# Altium PCB RF-IR-Blaster-v1.1.PcbDoc (part 1 of 3)
Units mil, origin at the board's own origin, x right, y up, seen from the top; angles counter-clockwise.
Board outline 2559.06 x 2401.57 mil, 2 copper layers (Top Layer, Bottom Layer), stack 62.205 mil thick; 68 components, 37 nets, 870 pads, 147 vias.
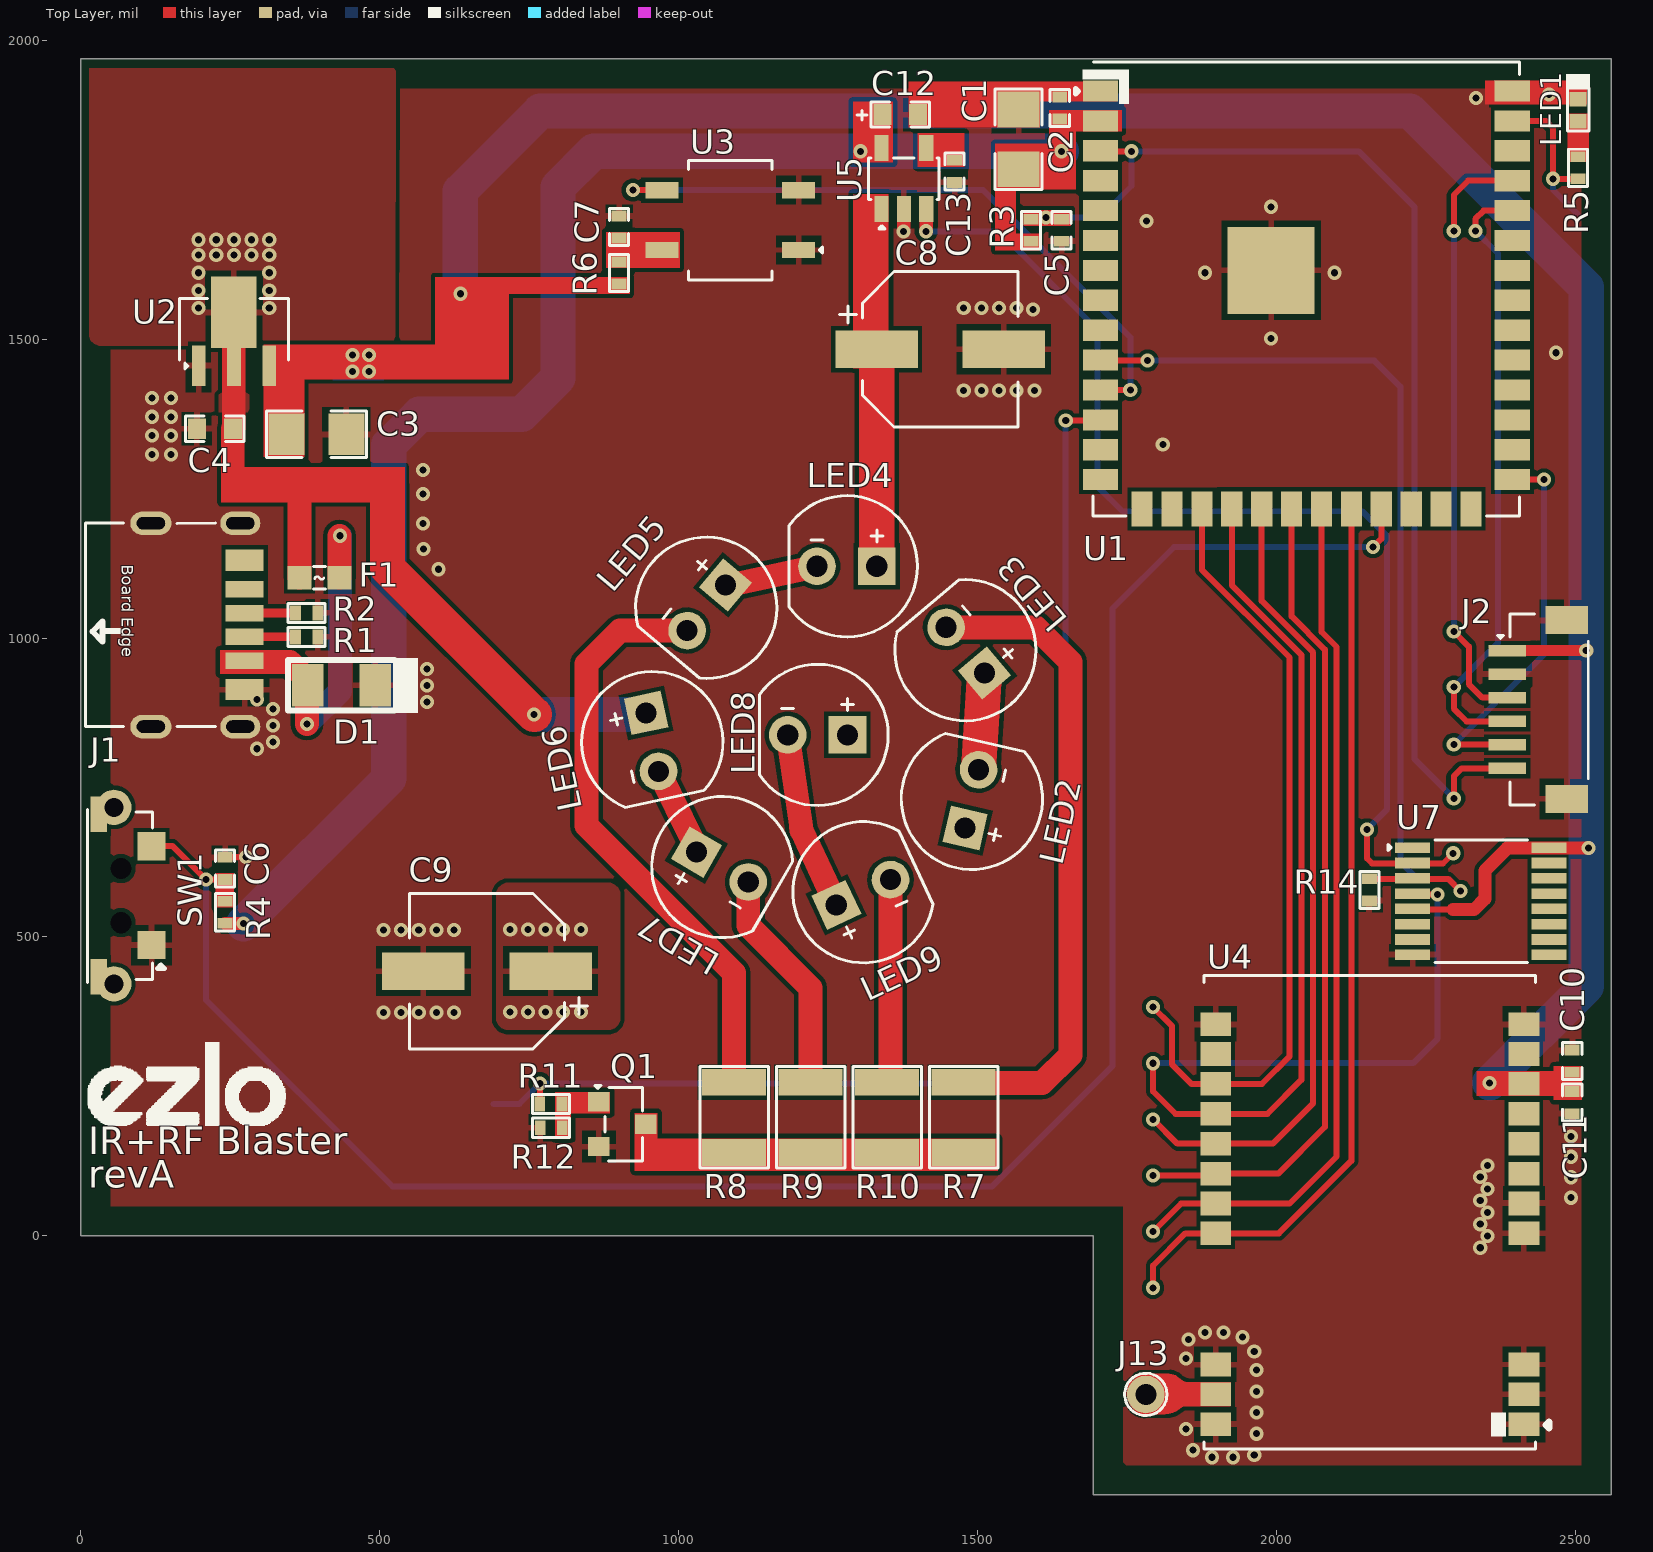
[diagram p0: Top Layer view]
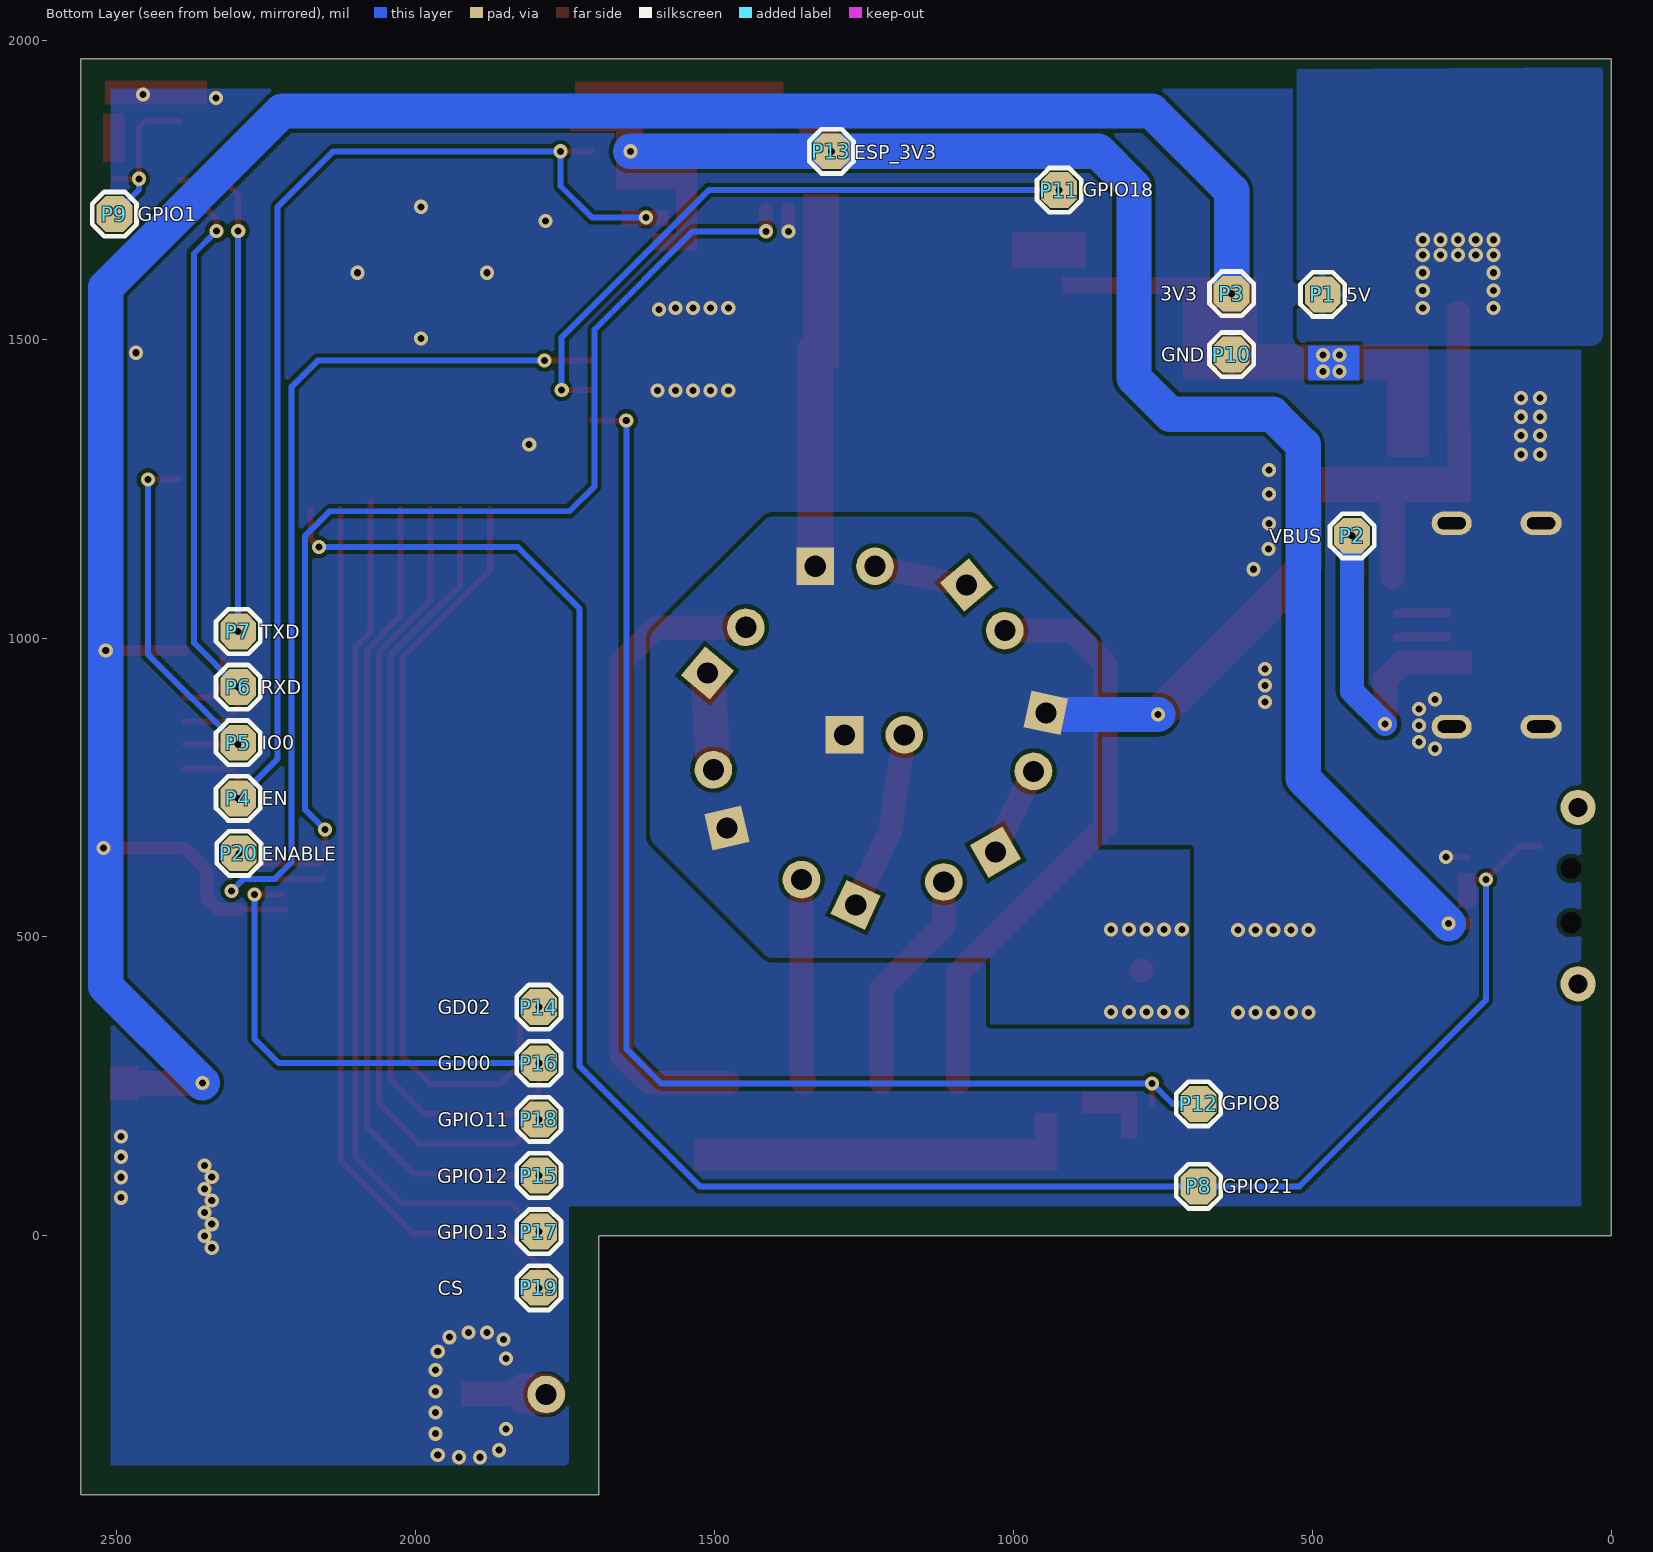
[diagram p1: Bottom Layer view, seen from below]

## Layer stack, top to bottom
Top Solder: solder mask 0.3937, Solder Resist, Dk 3.3
Top Layer: signal copper 1.378
Dielectric 1: dielectric 59.4488, FR-4, Dk 4.5
Bottom Layer: signal copper 1.378
Bottom Solder: solder mask 0.3937, Solder Resist, Dk 3.3

## Board outline
0,0 0,1968.5 2559.06,1968.5 2559.06,-433.07 1692.91,-433.07 1692.91,0

## Design rules (kind name [scope] priority, off if disabled: settings)
Clearance [All] p1: gap=7 ignorepadtopadclearanceinfootprint=FALSE except(0: Arc-Hole Track-Hole SMDPad-Hole THPad-Hole Via-Hole Fill-Hole Poly-Hole Region-Hole Text-Hole; 4: Arc-SMDPad Track-SMDPad SMDPad-SMDPad)
HoleSize [All] p1: absolutevalues=TRUE maxlimit=1000 minlimit=1 maxpercent=80.000 minpercent=20.000
HoleToHoleClearance [All] p1: gap=0 allowstackedmicrovias=TRUE
MinimumSolderMaskSliver [All] p1: minsoldermaskwidth=0
PolygonConnect [All] p1: thpad.connectstyle=Direct thpad.reliefconductorwidth=10 thpad.reliefentries=4 thpad.polygonreliefangle="90 Angle" thpad.airgapwidth=10 smdpad.connectstyle=Relief smdpad.reliefconductorwidth=10 smdpad.reliefentries=4 smdpad.polygonreliefangle="90 Angle" smdpad.airgapwidth=10 via.connectstyle=Direct via.reliefconductorwidth=10 via.reliefentries=4 via.polygonreliefangle="90 Angle" via.airgapwidth=10
RoutingVias [All] p1: holewidth=11.81 width=23.62 viastyle="Through Hole" minholewidth=11.81 minwidth=23.62 maxholewidth=11.81 maxwidth=23.62
SilkToSilkClearance [All] p1: silktosilkclearance=0
SilkToSolderMaskClearance [IsPad] p1: minsilkscreentomaskgap=0 clearancetoexposedcopper=TRUE
SolderMaskExpansion [All] p1: expansion=4 istentingtop=FALSE
Width [All] p1: maxlimit=59.06 minlimit=10 preferedwidth=22
25 further rules are at their usual default settings.

## Classes and differential pairs
component class U_USB-Power-Sheet: C3 C4 C12 C13 D1 F1 J1 P1 P2 P3 P10 P13 R1 R2 U2 U5
component class U_IR-Transmitter-Sheet: C8 C9 LED2 LED3 LED4 LED5 LED6 LED7 LED8 LED9 P12 Q1 R7 R8 R9 R10 R11 R12
component class U_IR-Reciever-Sheet: C7 P11 R6 U3
component class U_Controller-Sheet: C1 C2 C5 C6 J2 LED1 P4 P5 P6 P7 P8 P9 R3 R4 R5 SW1 U1
component class U_CC1101-Sheet: C10 C11 J13 P14 P15 P16 P17 P18 P19 P20 R14 U4 U7

## Components (designator, comment, footprint, x,y, rotation, side; value= is the part's Value field where it differs from the comment)
C1 "22uF" Cap-1206 1568,1834 r270 top locked
C2 "100nF" Cap-0402 1637,1886.5 r270 top
C3 "22uF" Cap-1206 394.01,1340.86 r180 top locked
C4 "10uF" CAP-0603 224,1350 r0 top locked
C5 "1uF" Cap-0402 1640.01,1681.93 r90 top locked
C6 "100nF" Cap-0402 241.01,614.86 r270 top locked
C7 "4.7uF" Cap-0402 900.01,1687.43 r270 top locked
C8 "220uF" RT1A221M0605 1437.01,1482.93 r0 top locked
C9 "220uF" RT1A221M0605 679.13,442.91 r180 top locked
C10 "1uF" Cap-0402 2494.01,292.43 r270 top locked
C11 "100nF" Cap-0402 2494.01,222.93 r90 top locked
C12 "1uF" F981E105MMA 1370.29,1875.35 r0 top
C13 "10nF" Cap-0402 1461,1780.5 r90 top
D1 "SMF5.0CA" SOD-123FL 435.71,920.93 r180 top locked
F1 "BSMD0603L-100" fuse-0603 399.01,1100.86 r180 top locked
J1 "TYPE-C-31-M-17" TYPE-C-31-M-17_ 195.35,1021.94 r270 top locked
J2 "Voltlink Target" "Voltlink Target" 2435.3,880.46 r270 top locked
J13 "Test Point TH 0.9mm" "TP 0.9mm" 1781,-265 r0 top
LED1 "XZVG68W-2" LED-0402 2504.01,1882.63 r90 top locked
LED2 "IR333-A" IR333_A 1490.01,730.93 r77 top locked
LED3 "IR333-A" IR333_A 1479.15,979.63 r130 top locked
LED4 "IR333-A" IR333_A 1281.01,1119.93 r180 top locked
LED5 "IR333-A" IR333_A 1045.87,1050.63 r230 top locked
LED6 "IR333-A" IR333_A 955.61,825.84 r282 top locked
LED7 "IR333-A" IR333_A 1072.71,616.93 r330 top locked
LED8 "IR333-A" IR333_A 1232,838 r180 top
LED9 "IR333-A" IR333_A 1308.68,574.87 r25 top locked
P1 "TEST POINT" Test-point 482.28,1574.8 r180 bottom locked
P2 "TEST POINT" Test-point 433,1171 r180 bottom locked
P3 "TEST POINT" Test-point 634.55,1575.8 r180 bottom locked
P4 "TEST POINT" Test-point 2296.01,731.93 r180 bottom locked
P5 "TEST POINT" Test-point 2296.01,824.93 r180 bottom locked
P6 "TEST POINT" Test-point 2296.01,917.93 r180 bottom locked
P7 "TEST POINT" Test-point 2296.01,1010.93 r180 bottom locked
P8 "TEST POINT" Test-point 690,83 r180 bottom
P9 "TEST POINT" Test-point 2503,1709 r270 bottom
P10 "TEST POINT" Test-point 634.55,1474 r180 bottom locked
P11 "TEST POINT" Test-point 923,1749 r180 bottom
P12 "TEST POINT" Test-point 690,221 r180 bottom
P13 "TEST POINT" Test-point 1304,1814 r180 bottom
P14 "TEST POINT" Test-point 1793,382.77 r90 bottom
P15 "TEST POINT" Test-point 1793,101.11 r90 bottom
P16 "TEST POINT" Test-point 1793,288.89 r90 bottom
P17 "TEST POINT" Test-point 1793,7.23 r90 bottom
P18 "TEST POINT" Test-point 1793,195 r90 bottom
P19 "TEST POINT" Test-point 1793,-86.66 r90 bottom
P20 "TEST POINT" Test-point 2295,640 r180 bottom
Q1 "YJL2302B" SOT-23-3L_ 905.51,187.01 r270 top locked
R1 "5.1K" Res-0402 377.5,1002 r180 top locked
R2 "5.1K" Res-0402 377.5,1042 r180 top locked
R3 "10K" Res-0402 1589.01,1681.93 r270 top locked
R4 "10K" Res-0402 241.01,541.36 r270 top locked
R5 "1K" Res-0402 2504.01,1786.43 r270 top locked
R6 "100R" Res-0402 900.01,1610.43 r270 top locked
R7 "14R" Res_1210 1476.38,198.34 r270 top
R8 "14R" Res_1210 1092.52,198.34 r270 top
R9 "14R" Res_1210 1220.47,198.34 r270 top
R10 "14R" Res_1210 1348.43,198.34 r270 top
R11 "100R" Res-0402 786,221 r180 top locked
R12 "10K" Res-0402 786.5,181 r0 top locked
R14 "10K" Res-0402 2155,578.89 r90 top
SW1 "YTS-B003-2A" YTS-B003-2A 73.9,569.2 r90 top locked
U1 "ESP32-S3-WROOM-1U-N4" "41-SMD UFL Module" 2049.5,1565.25 r0 top locked
U2 "LR1107G-33-AB3-C-R" SOT-89-3 255.91,1500 r0 top locked
U3 "IRM-H638T/TR2" SMD-4,4x5mm 1086.01,1698.93 r180 top locked
U4 "E07-400M10S" E07-400M10S 2155.51,19.68 r180 top locked
U5 "SPX3819M5-L-3-3/TR" SOT-23-5 1376.43,1768.35 r90 top
U7 "CD4043BPWR" TSSOP_16 2341.17,559.8 r0 top

## Footprints (in the part's own frame and the unit in brackets; to place one, negate y for a bottom-side part, rotate by r counter-clockwise, add the part's x,y. Pads: shape width x height; smd on the part's side, far side on the other; paste and mask are expansions set on the pad)
"41-SMD UFL Module" [mm]
  rect 1.5x0.9 smd: 1(-8.75,8.88) 2(-8.75,7.61) 3(-8.75,6.34) 4(-8.75,5.07) 5(-8.75,3.8) 6(-8.75,2.53) 7(-8.75,1.26) 8(-8.75,-0.01) 9(-8.75,-1.28) 10(-8.75,-2.55) 11(-8.75,-3.82) 12(-8.75,-5.09) 13(-8.75,-6.36) 14(-8.75,-7.63) 27(8.75,-7.63) 28(8.75,-6.36) 29(8.75,-5.09) 30(8.75,-3.82) 31(8.75,-2.55) 32(8.75,-1.28) 33(8.75,-0.01) 34(8.75,1.26) 35(8.75,2.53) 36(8.75,3.8) 37(8.75,5.07) 38(8.75,6.34) 39(8.75,7.61) 40(8.75,8.88)
  rect 0.9x1.5 smd: 15(-6.98,-8.88) 16(-5.71,-8.88) 17(-4.44,-8.88) 18(-3.17,-8.88) 19(-1.9,-8.88) 20(-0.63,-8.88) 21(0.64,-8.88) 22(1.91,-8.88) 23(3.18,-8.88) 24(4.45,-8.88) 25(5.72,-8.88) 26(6.99,-8.88)
  rect 3.7x3.7 smd: 41(-1.5,1.26)
  silkscreen extent -9.8,-9.17 9.05,10.11, body extent -9,-9.12 10.99,123, height 7.73
Cap-0402 [mil]
  rect 18x25 smd mask+2.36: 1(-18.5,0) 2(18.5,0)
  silkscreen extent -31,-16 31,16, body extent -20,-10 20,10, height 19
CAP-0603 [mil]
  rect 30x35 smd mask+2.36: 1(-30,0) 2(30,0)
  silkscreen extent -49,-21 49,21, body extent -32,-16 31,16, height 34
Cap-1206 [mil] "SMD 1206"
  rect 60x70 smd: 1(-50,0) 2(50,0)
  silkscreen extent -84,-39 84,39, body extent -63,-31 63,32, height 39
E07-400M10S [mm]
  rect 1.3x1 smd: 1(-6.55,8.5) 2(-6.55,7.23) 3(-6.55,5.96) 4(-6.55,0.39) 5(-6.55,-0.88) 6(-6.55,-2.15) 7(-6.55,-3.42) 8(-6.55,-4.69) 9(-6.55,-5.96) 10(-6.55,-7.23) 11(-6.55,-8.5) 12(6.55,-8.5) 13(6.55,-7.23) 14(6.55,-5.96) 15(6.55,-4.69) 16(6.55,-3.42) 17(6.55,-2.15) 18(6.55,-0.88) 19(6.55,0.39) 20(6.55,5.96) 21(6.55,7.23) 22(6.55,8.5)
  silkscreen extent -7.62,-10.57 7.04,9.55, body extent -7,-10.51 7,9.49, height 3.1
F981E105MMA [mil]
  rect 30x35 smd mask+2.36: 1(-30,0) 2(30,0)
  silkscreen extent -72,-21 49,21, body extent -32,-16 31,16, height 34
fuse-0603 [mm]
  rect 1x1 smd: 1(-0.85,0) 2(0.85,0)
  silkscreen extent -0.25,-0.48 0.25,0.48, body extent -0.77,-0.42 0.78,0.43, height 0.45
IR333_A [mm]
  rect 1.6x1.6 hole 0.9: 1(-1.27,0)
  round 1.6 hole 0.9: 2(1.27,0)
  silkscreen extent -3,-3 2.47,3, body extent -2.95,-10.72 2.45,0.23, height 7.95
LED-0402 [mm]
  rect 0.62x0.72 smd: 1(-0.475,0) 2(0.475,0)
  silkscreen extent -0.89,-0.51 1.55,0.51, body extent -0.5,-0.25 0.51,0.25, height 0.45
Res-0402 [mil]
  rect 18x25 smd mask+2.17: 1(-18.5,0) 2(18.5,0)
  silkscreen extent -32,-17 32,16, body extent -23,-11 23,11, height 16
Res_1210 [mm]
  rect 1.14x2.72 smd: 1(-1.49,0) 2(1.49,0)
  silkscreen extent -2.16,-1.45 2.16,1.45, body extent -1.6,-1.25 1.6,1.25, height 0.7
RT1A221M0605 [mm]
  rect 3.5x1.6 smd: 1(-2.7,0) 2(2.7,0)
  silkscreen extent -4.27,-3.3 3.3,3.3, body extent -3.61,-3.33 3.59,3.27, height 5.4
SMD-4,4x5mm [mm]
  rect 1.4x0.7 smd: 1(-2.9,1.27) 2(-2.9,-1.27) 3(2.9,-1.27) 4(2.9,1.27)
  silkscreen extent -3.91,-2.54 1.78,2.54, body extent -3.5,-2.5 3.5,2.5, height 3.99
SOD-123FL [mm]
  rect 1.34x1.8 smd: 1(-1.43,0) 2(1.43,0)
  silkscreen extent -3.25,-1.17 2.26,1.17, body extent -1.8,-0.82 1.8,0.82, height 0.95
SOT-23-3L_ [mm]
  rect 0.82x0.92 smd: 1(-0.95,-1) 2(0.95,-1) 3(0,1)
  silkscreen extent -1.65,-1.17 1.56,0.86, body extent -1.5,-1.25 1.5,1.25, height 1.1
SOT-23-5 [mm]
  rect 1.1x0.6 smd: 1(-1.3,0.95) 2(-1.3,0) 3(-1.3,-0.95) 4(1.3,-0.95) 5(1.3,0.95)
  silkscreen extent -2.13,-1.5 0.88,1.5, body extent -1.4,-1.45 1.4,1.45, height 1.45
SOT-89-3 [mm]
  rect 0.58x1.73 smd: 1(-1.5,-1.132) 2(0,-1.132) 3(1.5,-1.132)
  rect 1.933x3.03 smd: 2(0,1.132)
  silkscreen extent -2.31,-1.27 2.31,1.73, body extent -2.25,-1.84 2.25,2.41, height 1.54
Test-point [mil]
  oct 60x60 smd: 1(0,0)
  silkscreen extent -37,-37 37,37
"TP 0.9mm" [mm]
  round 1.6 hole 0.9: 1(0,0)
  silkscreen extent -0.9,-0.9 0.9,0.9
TSSOP_16 [mm]
  rect 1.5x0.45 smd mask+0.05: 1(-2.9,2.275) 2(-2.9,1.625) 3(-2.9,0.975) 4(-2.9,0.325) 5(-2.9,-0.325) 6(-2.9,-0.975) 7(-2.9,-1.625) 8(-2.9,-2.275) 9(2.9,-2.275) 10(2.9,-1.625) 11(2.9,-0.975) 12(2.9,-0.325) 13(2.9,0.325) 14(2.9,0.975) 15(2.9,1.625) 16(2.9,2.275)
  silkscreen extent -3.93,-2.61 1.98,2.61, body extent -3.2,-2.55 3.2,2.55, height 1.23
TYPE-C-31-M-17_ [mm]
  rect 0.7x1.6 smd: A5(-0.5,1.99) A9(1.52,1.99) B5(0.5,1.99) B9(-1.52,1.99)
  rect 0.9x1.6 smd: A12(2.75,1.99) B12(-2.75,1.99)
  oval 1x1.7 hole 0.52 slot 1.2 at 90 deg: MH1(4.32,1.81) MH4(-4.32,1.81)
  oval 1x1.75 hole 0.52 slot 1.2 at 90 deg: MH2(4.32,-1.99) MH3(-4.32,-1.99)
  silkscreen extent -4.32,-4.78 4.32,0.75, body extent -4.47,-4.72 4.47,2.08, height 3.38
"Voltlink Target" [mm]
  rect 0.5x1.6 smd: 1(-2.5,-1.262) 2(-1.5,-1.262) 3(-0.5,-1.262) 4(0.5,-1.262) 5(1.5,-1.262) 6(2.5,-1.262)
  rect 1.2x1.8 smd: MP1(-3.8,1.262) MP2(3.8,1.262)
  silkscreen extent -4.06,-1.68 4.06,2.17, body extent -4,-1.49 4,2.11, height 4.25
YTS-B003-2A [mm]
  rect 1.2x1.2 smd: 1(-2.1,-1.125) 2(2.1,-1.125)
  rect 1.5x0.7 smd: 3(3.45,1.125) 4(-3.45,1.125)
  round 1.5 hole 0.8: 5(3.75,0.475) 6(-3.75,0.475)
  round 0 hole 0.9 unplated: MH0(-1.15,0.175) MH1(1.15,0.175)
  silkscreen extent -3.68,-1.68 3.66,1.6, body extent -3.7,-1.37 3.7,2.36, height 3.59

## Part data
C1 C3: library part C3216X5R1E226M160AB, "CAP CER 22UF 25V X5R 1206", Case Code (Imperial)=1206, Case Code (Metric)=3216, Dielectric=X5R, Dielectric Material=Ceramic, LCSC Part Number=C2167811, Manufacturer=TDK, Max Operating Temperature=85°C, Min Operating Temperature=-55°C, Package Quantity=1, Supplier Part Number 1=445-6000-1-ND, Tolerance=20%, Voltage Rating=25V, Capacitance=22uF, Case/Package=1206, ComponentLink1Description=https://product.tdk.com/info/en/documents/chara_sheet/C3216X5R1E226M160AB.pdf?src-supplier=Digi-Key, ComponentLink1URL=https://product.tdk.com/info/en/documents/chara_sheet/C3216X5R1E226M160AB.pdf?src-supplier=Digi-Key, ComponentLink2Description=http://www.mouser.com/ds/2/400/lcc_commercial_general_en-837201.pdf?src-supplier=Mouser, ComponentLink2URL=http://www.mouser.com/ds/2/400/lcc_commercial_general_en-837201.pdf?src-supplier=Mouser, Construction=Flat, Depth=1.6mm, Height=1.6mm, Item Type=Capacitor, Lead Free="Lead Free", Length=3.2mm, Manufacturer Part Number=C3216X5R1E226M160AB, Mount="Surface Mount", Packaging="Tape and Reel", Pricing 1="1=1.08, 10=0.822, 50=0.6832, 100=0.5882, 500=0.4554, 1000=0.39215 (USD)", REACH SVHC="No SVHC", Resistor Type=Ceramic, RoHS Compliant=Yes, Series=C, Stock 1=21442, Supplier 1=Digi-Key, Termination=SMD/SMT, Thickness=0.071inch, Voltage Rating (DC)=25V, Weight=0.000571oz, Width=0.063inch
C2 C6 C11: library part CC0402KRX5R7BB104, "CAP CER 0.1UF 16V X5R 0402", Case Code (Imperial)=0402, Case Code (Metric)=1005, Dielectric=X5R, LCSC Part Number=C106204, Manufacturer=Yageo, Max Operating Temperature=85°C, Min Operating Temperature=-55°C, Package Quantity=1, Resistor Type=Ceramic, Supplier Part Number 1=603-CC402KRX5R7BB104, Tolerance=10%, Voltage Rating=16V, Capacitance=100nF, Case/Package=0402, Category="Ceramic Capacitors", ComponentLink1Description=https://datasheet.ciiva.com/155/mlccorderingcode-155879.pdf?src-supplier=Digi-Key, ComponentLink1URL=https://datasheet.ciiva.com/155/mlccorderingcode-155879.pdf?src-supplier=Digi-Key, ComponentLink2Description=https://datasheet.ciiva.com/155/mlccorderingcode-155878.pdf?src-supplier=Digi-Key, ComponentLink2URL=https://datasheet.ciiva.com/155/mlccorderingcode-155878.pdf?src-supplier=Digi-Key, ComponentLink3Description=https://datasheet.ciiva.com/155/mlccorderingcode-155880.pdf?src-supplier=Digi-Key, ComponentLink3URL=https://datasheet.ciiva.com/155/mlccorderingcode-155880.pdf?src-supplier=Digi-Key, ComponentLink4Description=https://datasheet.ciiva.com/11464/upy-gphc-x5r-4v-to-50v-12-11464869.pdf?src-supplier=Avnet, ComponentLink4URL=https://datasheet.ciiva.com/11464/upy-gphc-x5r-4v-to-50v-12-11464869.pdf?src-supplier=Avnet, Construction=Flat, Depth=0.5mm, Halogen Free="Halogen Free", Height=0.5mm, Lead Free="Lead Free", Length=1mm, Manufacturer Part Number=CC0402KRX5R7BB104, Mount="Surface Mount", Number of Pins=2, Packaging="Tape and Reel", Pricing 1="1=0.10000, 10=0.02300, 50=0.02300, 100=0.01100, 1000=0.00600, 10000=0.00400 (USD)", Radiation Hardening=No, REACH SVHC=Unknown, RoHS=Yes, RoHS Compliant=Yes, Series=CC, Stock 1=936792, Supplier 1=Mouser, Termination=SMD/SMT, Thickness=0.022inch, Voltage Rating (DC)=16V, Width=0.02inch
C4: library part TMK107BBJ106MA-T, "CAP CER 10UF 25V X5R 0603", Case Code (Imperial)=0603, Case Code (Metric)=1608, LCSC Part Number=C386081, Manufacturer="Taiyo Yuden", Max Operating Temperature=85°C, Min Operating Temperature=-55°C, Supplier Part Number 1=587-6023-1-ND, Tolerance=20%, Voltage Rating=25V, Capacitance=10uF, Case/Package=0603, ComponentLink1Description=http://ds.yuden.co.jp/TYCOMPAS/ut/detail.do?productNo=TMK107BBJ106MA-T&fileName=TMK107BBJ106MA-T_SS&mode=specSheetDownload&src-supplier=Digi-Key, ComponentLink1URL=http://ds.yuden.co.jp/TYCOMPAS/ut/detail.do?productNo=TMK107BBJ106MA-T&fileName=TMK107BBJ106MA-T_SS&mode=specSheetDownload&src-supplier=Digi-Key, Lead Free="Lead Free", Manufacturer Part Number=TMK107BBJ106MA-T, Mount="Surface Mount", Packaging="Tape and Reel", Pricing 1="1=0.46, 10=0.32, 50=0.2238, 100=0.1918, 500=0.14386, 1000=0.12149 (USD)", RoHS Compliant=Yes, Stock 1=85333, Supplier 1=Digi-Key
C5 C10: library part UMK105CBJ105MV-F, "CAP CER 1UF 50V X5R 0402", LCSC Part Number=C2880413, Manufacturer="Taiyo Yuden", Supplier Part Number 1=587-6278-1-ND, ComponentLink1Description=http://www.farnell.com/datasheets/2801300.pdf?src-supplier=Newark, ComponentLink1URL=http://www.farnell.com/datasheets/2801300.pdf?src-supplier=Newark, ComponentLink2Description=http://www.farnell.com/datasheets/2801300.pdf?src-supplier=Farnell, ComponentLink2URL=http://www.farnell.com/datasheets/2801300.pdf?src-supplier=Farnell, ComponentLink3Description="https://ds.yuden.co.jp/TYCOMPAS/ut/detail?pn=UMK105CBJ105MV-F &amp;u=M&src-supplier=Digi-Key", ComponentLink3URL="https://ds.yuden.co.jp/TYCOMPAS/ut/detail?pn=UMK105CBJ105MV-F &amp;u=M&src-supplier=Digi-Key", Item Type=Capacitor, Lead Free="Lead Free", Manufacturer Part Number=UMK105CBJ105MV-F, Pricing 1="1=0.27, 10=0.184, 50=0.1224, 100=0.104, 500=0.07342, 1000=0.06424, 2500=0.06118, 5000=0.05659 (USD)", RoHS Compliant=Yes, Stock 1=412061, Supplier 1=Digi-Key
C7: library part CC0402KRX5R6BB475, "CAP CER 4.7UF 10V X5R 0402", Case Code (Imperial)=0402, Case Code (Metric)=1005, LCSC Part Number=C326586, Manufacturer=Yageo, Max Operating Temperature=85°C, Min Operating Temperature=-55°C, Supplier Part Number 1=3871698, Tolerance=10%, Voltage Rating=10V, Capacitance=4.7uF, Case/Package=0402, Category="Ceramic Capacitors", ComponentLink1Description=http://www.yageo.com/documents/recent/UPY-GPHC_X5R_4V-to-50V_25.pdf?src-supplier=Digi-Key, ComponentLink1URL=http://www.yageo.com/documents/recent/UPY-GPHC_X5R_4V-to-50V_25.pdf?src-supplier=Digi-Key, Manufacturer Part Number=CC0402KRX5R6BB475, Mount="Surface Mount", Packaging="Cut Tape", Pricing 1="10000=0.02310, 50000=0.02100 (GBP)", RoHS=Yes, RoHS Compliant=Yes, Stock 1=20000, Supplier 1=Farnell
C8 C9: library part RT1A221M0605, "220uF 5.4mm 10V 6.3mm ±20% SMD,D6.3xL5.4mm Aluminum Electrolytic Capacitors - SMD ROHS", LCSC Part Number=C267466, Manufacturer=ROQANG, Package=SMD,D6.3xL5.4mm, ComponentLink1Description=LCSC, ComponentLink1URL=https://lcsc.com/product-detail/Aluminum-Electrolytic-Capacitors-SMD_ROQANG-RT1A221M0605_C267466.html, Item Type=Capacitor, Manufacturer Part Number=RT1A221M0605
C12: library part F981E105MMA, "CAP TANT 1UF 20% 25V 0603", Case/Package=0603, ESR (Equivalent Series Resistance)=10R, Manufacturer="Kyocera AVX", Max Operating Temperature=125°C, Min Operating Temperature=-55°C, Supplier Part Number 1=478-8658-1-ND, Tolerance=20%, Voltage Rating=25V, Capacitance=1uF, Category="Tantalum Capacitors", ComponentLink1Description=http://www.mouser.com/ds/2/40/f98-775787.pdf?src-supplier=Mouser, ComponentLink1URL=http://www.mouser.com/ds/2/40/f98-775787.pdf?src-supplier=Mouser, ComponentLink2Description=http://www.farnell.com/datasheets/2096554.pdf?src-supplier=Newark, ComponentLink2URL=http://www.farnell.com/datasheets/2096554.pdf?src-supplier=Newark, ComponentLink3Description=http://datasheets.avx.com/F98.pdf?src-supplier=Digi-Key, ComponentLink3URL=http://datasheets.avx.com/F98.pdf?src-supplier=Digi-Key, Features="General Purpose", Manufacturer Part Number=F981E105MMA, Mount="Surface Mount", Packaging="Tape and Reel", Pricing 1="1=0.79000, 10=0.55800, 50=0.42220, 100=0.36770, 500=0.27236, 1000=0.23151 (USD)", RoHS=Yes, RoHS Compliant=Yes, Stock 1=11167, Supplier 1=Digi-Key
C13: library part CC0402KRX7R8BB103, "CAP CER 10000PF 25V X7R 0402", Case Code (Imperial)=0402, Case Code (Metric)=1005, Dielectric=X7R, LCSC Part Number=C327025, Manufacturer=Yageo, Max Operating Temperature=125°C, Min Operating Temperature=-55°C, Package Quantity=1, Supplier Part Number 1=311-1337-1-ND, Tolerance=10%, Voltage Rating=25V, Capacitance=10nF, Case/Package=0402, ComponentLink1Description=http://www.yageo.com/documents/recent/UPY-GPHC_X7R_6.3V-to-50V_18.pdf?src-supplier=Digi-Key, ComponentLink1URL=http://www.yageo.com/documents/recent/UPY-GPHC_X7R_6.3V-to-50V_18.pdf?src-supplier=Digi-Key, ComponentLink2Description=https://www.verical.com/server-webapp/html/getDatasheet?partID=375418&src-supplier=Verical, ComponentLink2URL=https://www.verical.com/server-webapp/html/getDatasheet?partID=375418&src-supplier=Verical, ComponentLink3Description=http://www.yageo.com/documents/recent/UPY-GPHC_X7R_6.3V-to-50V_8.pdf?src-supplier=Avnet, ComponentLink3URL=http://www.yageo.com/documents/recent/UPY-GPHC_X7R_6.3V-to-50V_8.pdf?src-supplier=Avnet, ComponentLink4Description=https://4donline.ihs.com/images/VipMasterIC/IC/YAGO/YAGO-S-A0003557223/YAGO-S-A0003557223-1.pdf?hkey=52A5661711E402568146F3353EA87419&src-supplier=Element14, ComponentLink4URL=https://4donline.ihs.com/images/VipMasterIC/IC/YAGO/YAGO-S-A0003557223/YAGO-S-A0003557223-1.pdf?hkey=52A5661711E402568146F3353EA87419&src-supplier=Element14, ComponentLink5Description=http://www.farnell.com/datasheets/2167236.pdf?src-supplier=Element14, ComponentLink5URL=http://www.farnell.com/datasheets/2167236.pdf?src-supplier=Element14, ComponentLink6Description=http://www.mouser.com/ds/2/447/Yageo_UPY-GP_NP0_16V-to-50V_9-358835.pdf?src-supplier=Mouser, ComponentLink6URL=http://www.mouser.com/ds/2/447/Yageo_UPY-GP_NP0_16V-to-50V_9-358835.pdf?src-supplier=Mouser, Composition=Ceramic, Depth=0.5mm, Halogen Free="Halogen Free", Height=0.5mm, Lead Free="Lead Free", Length=1mm, Manufacturer Part Number=CC0402KRX7R8BB103, Mount="Surface Mount", Packaging="Tape and Reel", Pricing 1="1=0.1, 10=0.021, 100=0.0093, 500=0.00666, 1000=0.00523, 2500=0.00476, 5000=0.00438 (USD)", Radiation Hardening=No, REACH SVHC=Unknown, Stock 1=0, Supplier 1=Digi-Key, Termination=SMD/SMT, Thickness=0.022inch, Voltage Rating (DC)=25V, Width=0.02inch
D1: "9.2V 6.4V 5V SOD-123FL TVS ROHS", LCSC Part Number=C2980402, Manufacturer=GOODWORK, Package=SOD-123FL, ComponentLink1Description=LCSC, ComponentLink1URL=https://www.lcsc.com/product-detail/TVS_GOODWORK-SMF5-0CA_C2980402.html, Item Type="TVS Diode", Manufacturer Part Number=SMF5.0CA
F1: "6V 1A 50A 1W -40℃~+85℃ 2A 9mΩ 0.5s 80mΩ 0603 Resettable Fuses ROHS", LCSC Part Number=C2757929, Manufacturer=BHFUSE, Package=0603, ComponentLink1Description=LCSC, ComponentLink1URL=https://lcsc.com/product-detail/Resettable-Fuses_BHFUSE-BSMD0603L-100_C2757929.html, Item Type=Fuse, Manufacturer Part Number=BSMD0603L-100
J1: "Receptacle USB - Type C 6 - USB Connectors ROHS", Manufacturer="Koren Hroparts Elec", Manufacturer Part Number=Type-C-31-M-17, ComponentLink1Description=LCSC, ComponentLink1URL=https://www.lcsc.com/product-detail/USB-Connectors_Korean-Hroparts-Elec-TYPE-C-31-M-17_C283540.html
J2: library part C145963, "1x6P SH 1 1mm 6 SMD,P=1mm Wire To Board / Wire To Wire Connector ROHS", Manufacturer=BOOMELE, Package=SMD,P=1mm, ComponentLink1Description=LCSC, ComponentLink1URL=https://www.lcsc.com/product-detail/Wire-To-Board-Wire-To-Wire-Connector_BOOMELE-Boom-Precision-Elec-C145963_C145963.html, Item Type=Connector, LCSC Part Number=C145963, Manufacturer Part Number=C145963
J13: "------", Item Type="Test Point", Manufacturer Part Number="Test Point TH 0.9mm"
LED1: "LED GREEN CLEAR CHIP SMD", Case Code (Imperial)=0402, Case Code (Metric)=1005, Color=Green, Forward Voltage=2.1V, Lens Color=Colorless, Manufacturer=SunLED, Supplier Part Number 1=1497-1219-6-ND, Test Current=20mA, Case/Package=0402, ComponentLink1Description=http://www.sunledusa.com/products/spec/XZVG68W-2.pdf?src-supplier=Digi-Key, ComponentLink1URL=http://www.sunledusa.com/products/spec/XZVG68W-2.pdf?src-supplier=Digi-Key, ComponentLink2Description=https://www.sunledusa.com/products/spec/XZVG68W-2.pdf?src-supplier=Digi-Key, ComponentLink2URL=https://www.sunledusa.com/products/spec/XZVG68W-2.pdf?src-supplier=Digi-Key, Dominant Wavelength=570nm, Height=0.6mm, Item Type=LED, Length=1mm, Lens Transparency=Clear, Luminous Intensity=49mcd, Manufacturer Part Number=XZVG68W-2, Mount="Surface Mount", Packaging="Tape and Reel", Pricing 1="1=0.5, 10=0.36, 100=0.16, 500=0.112, 1000=0.092 (USD)", Stock 1=4185, Supplier 1=Digi-Key, Viewing Angle=120°, Width=0.5mm
LED2 LED3 LED4 LED5 LED6 LED7 LED8 LED9: "EMITTER IR 940NM 100MA RADIAL", Case/Package=Radial, Forward Current=50mA, Forward Voltage=1.2V, LCSC Part Number=C95407, Manufacturer=Everlight, Max Operating Temperature=85°C, Max Power Dissipation=100mW, Min Operating Temperature=-40°C, Package Quantity=500, Reverse Voltage=5V, Supplier Part Number 1=1080-1080-ND, Test Current=20mA, Category=LEDs, ComponentLink1Description=https://datasheet.ciiva.com/2107/201407061516067600-2107736.pdf?src-supplier=Digi-Key, ComponentLink1URL=https://datasheet.ciiva.com/2107/201407061516067600-2107736.pdf?src-supplier=Digi-Key, ComponentLink2Description=https://datasheet.ciiva.com/48438/ir333-a-eng-tds-48438869.pdf?src-supplier=Distrelec, ComponentLink2URL=https://datasheet.ciiva.com/48438/ir333-a-eng-tds-48438869.pdf?src-supplier=Distrelec, Depth=5.9mm, Item Type="Infrared LED", Lead Free="Lead Free", Length=5.9mm, Lens Style=Diffused,Colored,Circular, Manufacturer Part Number=IR333-A, Mount="Through Hole", Number of Elements=1, Number of LEDs=1, Number of Pins=2, Orientation="Top View", Packaging=Bulk, Power Dissipation=100mW, Pricing 1="1=0.54000, 10=0.33000, 100=0.18950, 1000=0.14832, 2000=0.13596, 5000=0.12360, 10000=0.11536, 25000=0.11124 (USD)", RoHS=Yes, RoHS Compliant=Yes, Series=-, Stock 1=73854, Supplier 1=Digi-Key, Viewing Angle=20°, Wavelength=940nm
P1 P2 P3 P4 P5 P6 P7 P8 P9 P10 P11 P12 P13 P14 P15 P16 P17 P18 P19 P20: "Test Point ON", Item Type="TEST POINT"
Q1: "20V 3A 40mΩ@4.5V,3A 700mW 780mV@250uA 29pF@10V N Channel 280pF@10V 2.9nC@4.5V -55℃~+150℃@(Tj) SOT-23-3L MOSFETs ROHS", LCSC Part Number=C699316, Manufacturer="Yangzhou Yangjie Elec Tech", Package=SOT-23-3L, ComponentLink1Description=LCSC, ComponentLink1URL=https://lcsc.com/product-detail/MOSFETs_Yangzhou-Yangjie-Elec-Tech-YJL2302B_C699316.html, Item Type=Mosfet, Manufacturer Part Number=YJL2302B
R1 R2: library part RC0402FR-075K1L, "RES 5.1K OHM 1% 1/16W 0402", Case Code (Imperial)=0402, Case Code (Metric)=1005, LCSC Part Number=C105872, Manufacturer=Yageo, Max Operating Temperature=155°C, Max Power Dissipation=63mW, Min Operating Temperature=-55°C, Package Quantity=1, Resistance=5.1kR, Resistance Tolerance=1%, Resistor Type="Thick Film", Temperature Coefficient=100ppm/°C, Voltage Rating=50V, Case/Package=0402, Category="Chip SMD Resistors", ComponentLink1Description=https://datasheet.ciiva.com/7983/1018594-7983519.pdf?src-supplier=Element14, ComponentLink1URL=https://datasheet.ciiva.com/7983/1018594-7983519.pdf?src-supplier=Element14, ComponentLink2Description=https://datasheet.ciiva.com/46394/1018594-46394936.pdf?src-supplier=Element14, ComponentLink2URL=https://datasheet.ciiva.com/46394/1018594-46394936.pdf?src-supplier=Element14, ComponentLink3Description=https://datasheet.ciiva.com/2453/pyu-r-int-thick-7-2453401.pdf?src-supplier=Digi-Key, ComponentLink3URL=https://datasheet.ciiva.com/2453/pyu-r-int-thick-7-2453401.pdf?src-supplier=Digi-Key, ComponentLink4Description=https://datasheet.ciiva.com/2453/pyu-r-int-thick-7-2453402.pdf?src-supplier=Digi-Key, ComponentLink4URL=https://datasheet.ciiva.com/2453/pyu-r-int-thick-7-2453402.pdf?src-supplier=Digi-Key, ComponentLink5Description=https://datasheet.ciiva.com/2453/pyu-r-int-thick-7-2453400.pdf?src-supplier=Digi-Key, ComponentLink5URL=https://datasheet.ciiva.com/2453/pyu-r-int-thick-7-2453400.pdf?src-supplier=Digi-Key, ComponentLink6Description=https://datasheet.ciiva.com/12558/pyu-rc0402-51-rohs-l-6-r-8721-12558460.pdf?src-supplier=Mouser, ComponentLink6URL=https://datasheet.ciiva.com/12558/pyu-rc0402-51-rohs-l-6-r-8721-12558460.pdf?src-supplier=Mouser, ComponentLink7Description=https://datasheet.ciiva.com/16744/pyu-rc0402-51-rohs-l-6-r-16744283.pdf?src-supplier=Future+Electronics, ComponentLink7URL=https://datasheet.ciiva.com/16744/pyu-rc0402-51-rohs-l-6-r-16744283.pdf?src-supplier=Future+Electronics, ComponentLink8Description=https://datasheet.ciiva.com/15189/getdatasheetpartid-323636-15189493.pdf?src-supplier=Verical, ComponentLink8URL=https://datasheet.ciiva.com/15189/getdatasheetpartid-323636-15189493.pdf?src-supplier=Verical, Construction=Rectangular, Depth=0.5mm, Features="Moisture Resistant", Height=0.016inch, Item Type=Resistor, Lead Free="Lead Free", Length=1mm, Manufacturer Part Number=RC0402FR-075K1L, Military Standard=Not, Number of Terminations=2, Packaging="Tape and Reel", Power Rating=63mW, Pricing 1="10000=0.00085 (USD)", RoHS=Yes, RoHS Compliant=Yes, Series=RC, Stock 1=65000, Supplier 1=Avnet, Supplier Part Number 1=RC0402FR-075K1L, Technology="THICK FILM", Termination=SMD/SMT, Tolerance=1%, Voltage Rating (DC)=50V, Width=0.02inch, Working Voltage=50V
R3 R4 R12: library part SR0402FR-7T10KL, "RES 10K OHM 1% 1/5W 0402", LCSC Part Number=C854480, Manufacturer=Yageo, Supplier Part Number 1=YAG5815CT-ND, ComponentLink1Description=http://www.yageo.com/documents/recent/PYu-SR_D_F%20tol_RoHS_L_3.pdf?src-supplier=Digi-Key, ComponentLink1URL=http://www.yageo.com/documents/recent/PYu-SR_D_F%20tol_RoHS_L_3.pdf?src-supplier=Digi-Key, Manufacturer Part Number=SR0402FR-7T10KL, Pricing 1="1=0.56, 10=0.398, 100=0.2072, 1000=0.11156, 2500=0.10757, 5000=0.10598 (USD)", RoHS Compliant=Yes, Stock 1=7859, Supplier 1=Digi-Key
R5: library part RC0402FR-071KL, "RES 1K OHM 1% 1/16W 0402", Case Code (Imperial)=0402, Case Code (Metric)=1005, LCSC Part Number=C106235, Manufacturer=Yageo, Max Operating Temperature=155°C, Max Power Dissipation=63mW, Min Operating Temperature=-55°C, Power Rating=62.5mW, Resistance=1kR, Resistance Tolerance=1%, Resistor Type="Thick Film", Temperature Coefficient=100ppm/°C, Voltage Rating=50V, Case/Package=0402, Category="Chip SMD Resistors", ComponentLink1Description=https://datasheet.ciiva.com/11819/0900766b80c66297-11819477.pdf?src-supplier=RSComponents, ComponentLink1URL=https://datasheet.ciiva.com/11819/0900766b80c66297-11819477.pdf?src-supplier=RSComponents, ComponentLink2Description=https://datasheet.ciiva.com/7983/1018594-7983502.pdf?src-supplier=Element14, ComponentLink2URL=https://datasheet.ciiva.com/7983/1018594-7983502.pdf?src-supplier=Element14, ComponentLink3Description=https://datasheet.ciiva.com/22747/1018594-22747513.pdf?src-supplier=Element14, ComponentLink3URL=https://datasheet.ciiva.com/22747/1018594-22747513.pdf?src-supplier=Element14, ComponentLink4Description=https://datasheet.ciiva.com/12666/pyu-rc0402-51-rohs-l-6-r-12666741.pdf?src-supplier=Mouser, ComponentLink4URL=https://datasheet.ciiva.com/12666/pyu-rc0402-51-rohs-l-6-r-12666741.pdf?src-supplier=Mouser, ComponentLink5Description=https://datasheet.ciiva.com/7849/1018594-7849869.pdf?src-supplier=Element14, ComponentLink5URL=https://datasheet.ciiva.com/7849/1018594-7849869.pdf?src-supplier=Element14, ComponentLink6Description=https://datasheet.ciiva.com/7849/1018594-7849871.pdf?src-supplier=Element14, ComponentLink6URL=https://datasheet.ciiva.com/7849/1018594-7849871.pdf?src-supplier=Element14, ComponentLink7Description=https://datasheet.ciiva.com/17063/pyu-rc0402-51-rohs-l-6-r-17063193.pdf?src-supplier=Future+Electronics, ComponentLink7URL=https://datasheet.ciiva.com/17063/pyu-rc0402-51-rohs-l-6-r-17063193.pdf?src-supplier=Future+Electronics, Construction=Rectangular, Depth=0.5mm, Features="Moisture Resistant", Height=0.32mm, Item Type=Resistor, Lead Free="Lead Free", Length=1mm, Manufacturer Part Number=RC0402FR-071KL, Military Standard=Not, Number of Pins=2, Number of Terminations=2, Packaging="Tape and Reel", Pricing 1="10000=0.00085, 20000=0.00087, 40000=0.00084, 60000=0.00083, 80000=0.00079, 100000=0.00078, 1000000=0.00076 (USD)", Reach SVHC Compliant=Yes, RoHS=Yes, RoHS Compliant=Yes, Series=RC, Size Code=0402, Stock 1=13030000, Supplier 1=Avnet, Supplier Part Number 1=RC0402FR-071KL, Technology="THICK FILM", Termination=SMD/SMT, Tolerance=1%, Voltage Rating (DC)=50V, Width=0.5mm
R6 R11: library part RC0402FR-07100RL, "RES 100 OHM 1% 1/16W 0402", Case Code (Imperial)=0402, Case Code (Metric)=1005, LCSC Part Number=C106232, Manufacturer=Yageo, Max Operating Temperature=155°C, Max Power Dissipation=63mW, Min Operating Temperature=-55°C, Power Rating=62.5mW, Resistance Tolerance=1%, Resistor Type="Thick Film", Supplier Part Number 1=603-RC0402FR-07100RL, Temperature Coefficient=100ppm/°C, Voltage Rating=50V, Case/Package=0402, Category="Chip SMD Resistors", ComponentLink1Description=https://datasheet.ciiva.com/11808/0900766b80c66297-11808765.pdf?src-supplier=RSComponents, ComponentLink1URL=https://datasheet.ciiva.com/11808/0900766b80c66297-11808765.pdf?src-supplier=RSComponents, ComponentLink2Description=https://datasheet.ciiva.com/7849/1784430-7849810.pdf?src-supplier=Element14, ComponentLink2URL=https://datasheet.ciiva.com/7849/1784430-7849810.pdf?src-supplier=Element14, ComponentLink3Description=https://datasheet.ciiva.com/28367/1018594-28367226.pdf?src-supplier=Element14, ComponentLink3URL=https://datasheet.ciiva.com/28367/1018594-28367226.pdf?src-supplier=Element14, ComponentLink4Description=https://datasheet.ciiva.com/22747/1018594-22747511.pdf?src-supplier=Element14, ComponentLink4URL=https://datasheet.ciiva.com/22747/1018594-22747511.pdf?src-supplier=Element14, ComponentLink5Description=https://datasheet.ciiva.com/12667/pyu-rc0402-51-rohs-l-6-r-12667957.pdf?src-supplier=Mouser, ComponentLink5URL=https://datasheet.ciiva.com/12667/pyu-rc0402-51-rohs-l-6-r-12667957.pdf?src-supplier=Mouser, ComponentLink6Description=https://datasheet.ciiva.com/15189/getdatasheetpartid-329466-15189335.pdf?src-supplier=Verical, ComponentLink6URL=https://datasheet.ciiva.com/15189/getdatasheetpartid-329466-15189335.pdf?src-supplier=Verical, ComponentLink7Description=https://datasheet.ciiva.com/16740/pyu-rc0402-51-rohs-l-6-r-16740566.pdf?src-supplier=Future+Electronics, ComponentLink7URL=https://datasheet.ciiva.com/16740/pyu-rc0402-51-rohs-l-6-r-16740566.pdf?src-supplier=Future+Electronics, Construction=Rectangular, Depth=0.5mm, Features="Moisture Resistant", Height=0.32mm, Item Type=Resistor, Lead Free="Lead Free", Length=1mm, Manufacturer Part Number=RC0402FR-07100RL, Military Standard=Not, Number of Pins=2, Number of Terminations=2, Packaging="Tape and Reel", Pricing 1="1=0.10000, 10=0.01200, 50=0.01200, 100=0.00500, 1000=0.00300, 2500=0.00200, 10000=0.00100 (USD)", REACH SVHC="No SVHC", Resistance=100R, RoHS=Yes, RoHS Compliant=Yes, Series=RC, Size Code=0402, Stock 1=699545, Supplier 1=Mouser, Technology="THICK FILM", Termination=SMD/SMT, Tolerance=1%, Voltage Rating (DC)=50V, Width=0.5mm
R7 R8 R9 R10: library part RTT1214R0FTP, "500mW Thick Film Resistors ±100ppm/℃ ±1% 14Ω 1210 Chip Resistor - Surface Mount ROHS", LCSC Part Number=C333127, Manufacturer=RALEC, Package=1210, ComponentLink1Description=LCSC, ComponentLink1URL=https://www.lcsc.com/product-detail/Chip-Resistor-Surface-Mount_RALEC-RTT1214R0FTP_C333127.html, Item Type=Resistor, Manufacturer Part Number=RTT1214R0FTP
R14: library part RC0402FR-0710KL, "RES 10K OHM 1% 1/16W 0402", Case Code (Imperial)=0402, Case Code (Metric)=1005, LCSC Part Number=C60490, Manufacturer=Yageo, Max Operating Temperature=155°C, Max Power Dissipation=63mW, Min Operating Temperature=-55°C, Power Rating=62.5mW, Resistance=10kR, Resistance Tolerance=1%, Resistor Type="Thick Film", Supplier Part Number 1=603-RC0402FR-0710KL, Temperature Coefficient=100ppm/°C, Voltage Rating=50V, Case/Package=0402, Category="Chip SMD Resistors", ComponentLink1Description=https://datasheet.ciiva.com/7660/38568-7660787.pdf?src-supplier=Element14, ComponentLink1URL=https://datasheet.ciiva.com/7660/38568-7660787.pdf?src-supplier=Element14, ComponentLink2Description=https://datasheet.ciiva.com/7849/1686128-7849814.pdf?src-supplier=Element14, ComponentLink2URL=https://datasheet.ciiva.com/7849/1686128-7849814.pdf?src-supplier=Element14, ComponentLink3Description=https://datasheet.ciiva.com/7983/1018594-7983486.pdf?src-supplier=Element14, ComponentLink3URL=https://datasheet.ciiva.com/7983/1018594-7983486.pdf?src-supplier=Element14, ComponentLink4Description=https://datasheet.ciiva.com/22747/1018594-22747512.pdf?src-supplier=Element14, ComponentLink4URL=https://datasheet.ciiva.com/22747/1018594-22747512.pdf?src-supplier=Element14, ComponentLink5Description=https://datasheet.ciiva.com/12667/pyu-rc0402-51-rohs-l-6-r-12667067.pdf?src-supplier=Mouser, ComponentLink5URL=https://datasheet.ciiva.com/12667/pyu-rc0402-51-rohs-l-6-r-12667067.pdf?src-supplier=Mouser, ComponentLink6Description=https://datasheet.ciiva.com/7849/1784430-7849813.pdf?src-supplier=Element14, ComponentLink6URL=https://datasheet.ciiva.com/7849/1784430-7849813.pdf?src-supplier=Element14, ComponentLink7Description=https://datasheet.ciiva.com/7849/1784430-7849815.pdf?src-supplier=Element14, ComponentLink7URL=https://datasheet.ciiva.com/7849/1784430-7849815.pdf?src-supplier=Element14, Construction=Rectangular, Depth=0.5mm, Features="Moisture Resistant", Height=0.32mm, Item Type=Resistor, Lead Free="Lead Free", Lead Pitch=0.2mm, Length=1mm, Manufacturer Part Number=RC0402FR-0710KL, Military Standard=Not, Number of Pins=2, Number of Terminations=2, Packaging="Tape and Reel", Pricing 1="1=0.10000, 10=0.01400, 50=0.01400, 100=0.00500, 1000=0.00300, 10000=0.00200 (USD)", REACH SVHC="No SVHC", RoHS=Yes, RoHS Compliant=Yes, Series=RC, Stock 1=18648329, Supplier 1=Mouser, Termination=SMD/SMT, Tolerance=1%, Voltage Rating (DC)=50V, Width=0.5mm, Working Voltage=50V
SW1: "3.5mm 3.5mm SMDSplicing Black Rectangle button 50mA Surface Mount 7mm SPST 100MΩ 20000 12V 250gf@±50gf SMD Tactile Switches ROHS", LCSC Part Number=C2910695, Manufacturer=YIYUAN, Package=Custom, ComponentLink1Description=LCSC, ComponentLink1URL=https://lcsc.com/product-detail/Tactile-Switches_YIYUAN-YTS-B003-2A_C2910695.html, Item Type="Tactile Switch", Manufacturer Part Number=YTS-B003-2A
U1: "RF TXRX MOD WIFI SURFACE MOUNT", LCSC Part Number=C2980296, Manufacturer="Espressif Systems", Supplier Part Number 1=1965-ESP32-S3-WROOM-1U-N4CT-ND, Category=Uncategorized, ComponentLink1Description=LCSC, ComponentLink1URL=https://www.lcsc.com/product-detail/WiFi-Modules_Espressif-Systems-ESP32-WROOM-32-N4_C82899.html, Item Type=Module, Manufacturer Part Number=ESP32-S3-WROOM-1U-N4, Pricing 1="1=3.25000 (USD)", RoHS=No, Stock 1=594, Supplier 1=Digi-Key
U2: "600mA 60dB Fixed 3.3V~3.3V Positive 7V SOT-89-3 Linear Voltage Regulators (LDO) ROHS", LCSC Part Number=C171498, Manufacturer="UTC(Unisonic Tech)", Package=SOT-89-3, ComponentLink1Description=LCSC, ComponentLink1URL=https://www.lcsc.com/product-detail/Linear-Voltage-Regulators-LDO_UTC-Unisonic-Tech-LR1107G-33-AB3-C-R_C171498.html, Item Type=IC, Manufacturer Part Number=LR1107G-33-AB3-C-R
U3: "IRM-H6 Series External Dimensions 5 x 7 x 4 mm SMT Infrared Receiver", LCSC Part Number=C91447, Manufacturer=Everlight, Max Operating Temperature=85°C, Min Operating Temperature=-25°C, Operating Supply Current=1.2mA, Operating Supply Voltage=5.5V, Package Quantity=2000, Supplier Part Number 1=5043152, Category="Optical Sensors", ComponentLink1Description=https://datasheet.ciiva.com/12418/irm-h638t-tr2-41100-12418542.pdf?src-supplier=Mouser, ComponentLink1URL=https://datasheet.ciiva.com/12418/irm-h638t-tr2-41100-12418542.pdf?src-supplier=Mouser, Item Type=IC, Lead Free="Lead Free", Manufacturer Part Number=IRM-H638T/TR2, Mount="Surface Mount", Number of Pins=4, Orientation="Top View", Packaging="Tape and Reel", Pricing 1="1000=0.53500, 2000=0.52000, 3000=0.51500, 4000=0.51000, 5000=0.49500 (USD)", RoHS=Yes, RoHS Compliant=Yes, Sensing Distance=8m, Supplier 1="Future Electronics"
U4: "RF Modules ROHS", LCSC Part Number=C2965513, Manufacturer="Chengdu Ebyte Elec Tech", Package=Custom, ComponentLink1Description=LCSC, ComponentLink1URL=https://www.lcsc.com/product-detail/RF-Modules_Chengdu-Ebyte-Elec-Tech-E07-400M10S_C2965513.html, Item Type=Module, Manufacturer Part Number=E07-400M10S
U5: "SPX3819 Series 3.3 V 500 mA Fixed Output SMT LDO Regulator - SOT-23-5", LCSC Part Number=C9055, Manufacturer=MaxLinear, Supplier Part Number 1=23R9703, Category="Voltage Regulators - Linear", ComponentLink1Description=LCSC, ComponentLink1URL=https://www.lcsc.com/product-detail/Linear-Voltage-Regulators-LDO_MaxLinear-SPX3819M5-L-3-3-TR_C9055.html, Item Type=IC, Manufacturer Part Number=SPX3819M5-L-3-3/TR, RoHS=Yes, RoHS Compliant=Yes, Supplier 1=Newark
U7: "16-Bit Transparent D-Type Latch With 3-State Outputs 48-TVSOP -40 to 125", LCSC Part Number=C2652970, Manufacturer="Texas Instruments", Manufacturer Part Number=SN74LVC16373ADGVR, Supplier Part Number=296-13242-1-ND, Category="Latches and Flip Flops", ComponentLink1Description=https://datasheet.ciiva.com/14288/sn74lvc16373a-14288272.pdf?src-supplier=Avnet, ComponentLink1URL=https://datasheet.ciiva.com/14288/sn74lvc16373a-14288272.pdf?src-supplier=Avnet, ComponentLink2Description=https://datasheet.ciiva.com/22746/1840227-22746081.pdf?src-supplier=Element14, ComponentLink2URL=https://datasheet.ciiva.com/22746/1840227-22746081.pdf?src-supplier=Element14, ComponentLink3Description=https://datasheet.ciiva.com/15088/getdatasheetpartid-527425-15088839.pdf?src-supplier=Verical, ComponentLink3URL=https://datasheet.ciiva.com/15088/getdatasheetpartid-527425-15088839.pdf?src-supplier=Verical, ComponentLink4Description=https://datasheet.ciiva.com/1882/sn74lvc16373a-1882418.pdf?src-supplier=Digi-Key, ComponentLink4URL=https://datasheet.ciiva.com/1882/sn74lvc16373a-1882418.pdf?src-supplier=Digi-Key, ComponentLink5Description=https://datasheet.ciiva.com/1882/sn74lvc16373a-1882419.pdf?src-supplier=Digi-Key, ComponentLink5URL=https://datasheet.ciiva.com/1882/sn74lvc16373a-1882419.pdf?src-supplier=Digi-Key, ComponentLink6Description=https://datasheet.ciiva.com/1882/sn74lvc16373a-1882420.pdf?src-supplier=Digi-Key, ComponentLink6URL=https://datasheet.ciiva.com/1882/sn74lvc16373a-1882420.pdf?src-supplier=Digi-Key, ComponentLink7Description=https://datasheet.ciiva.com/1508/1840227-1508576.pdf?src-supplier=Element14, ComponentLink7URL=https://datasheet.ciiva.com/1508/1840227-1508576.pdf?src-supplier=Element14, ComponentLink8Description=https://datasheet.ciiva.com/48704/001075154-da-01-en-ic-trans-sn74lvc16373adgvr-tvsop-48-tid-48704295.pdf?src-supplier=Conrad, ComponentLink8URL=https://datasheet.ciiva.com/48704/001075154-da-01-en-ic-trans-sn74lvc16373adgvr-tvsop-48-tid-48704295.pdf?src-supplier=Conrad, ComponentLink9Description=LCSC, ComponentLink9URL=https://www.lcsc.com/product-detail/Latches_Texas-Instruments-CD4043BPWR_C2652970.html, Item Type=IC, Pricing="1=1.51, 10=1.353, 25=1.284, 100=1.0546, 250=0.98588, 500=0.87122, 1000=0.68781 (USD)", RoHS=Yes, Stock=4536, Supplier=Digi-Key

## Free pads (board coordinates)
  round 19.68 on Mech1: 1(30.6,30.19) 1(30.6,30.19) 1(571.94,1929.8) 1(571.94,1929.8) 1(2520.76,-393.03) 1(2520.76,-393.03)
  oval 66.93x39.37 on Mech1: 1(56.19,851.45) 1(56.19,851.45) 1(56.19,1191.61) 1(205.8,851.45) 1(205.8,1191.61)
  round 23.62 on Mech1: 1(60.13,1024.29) 1(89.66,30.19) 1(101.47,1323.5) 1(101.47,1355) 1(101.47,1386.49) 1(101.47,1417.99) 1(129.03,729.01) 1(132.97,1323.5) 1(132.97,1355) 1(132.97,1386.49) 1(132.97,1417.99) 1(197.93,1520.35) 1(197.93,1549.88) 1(197.93,1579.41) 1(197.93,1608.93) 1(197.93,1634.52) 1(227.45,30.19) 1(227.45,1608.93) 1(227.45,1634.52) 1(256.98,1608.93) 1(256.98,1634.52) 1(276.67,831.37) 1(276.67,858.93) 1(276.67,886.49) 1(276.67,914.05) 1(276.67,1150.27) 1(276.67,1177.83) 1(276.67,1205.39) 1(286.51,1608.93) 1(286.51,1634.52) 1(304.23,831.37) 1(304.23,858.93) 1(304.23,886.49) 1(304.23,1150.27) 1(304.23,1177.83) 1(304.23,1205.39) 1(306.19,522.32) 1(316.04,1520.35) 1(316.04,1549.88) 1(316.04,1579.41) 1(316.04,1608.93) 1(316.04,1634.52) 1(355.41,1171.93) 1(355.41,1171.93) 1(365.25,30.19) 1(369.19,1406.18) 1(369.19,1433.74) 1(396.75,1406.18) 1(396.75,1433.74) 1(424.31,1406.18) 1(424.31,1433.74) 1(438.08,1004.6) 1(438.08,1043.97) 1(473.52,1103.03) 1(473.52,1132.56) 1(473.52,1162.08) 1(491.23,1307.75) 1(491.23,1339.25) 1(491.23,1370.74) 1(493.2,30.19) 1(503.05,374.68) 1(503.05,512.48) 1(503.05,1103.03) 1(503.05,1132.56) 1(503.05,1162.08) 1(532.57,374.68) 1(532.57,512.48) 1(532.57,1103.03) 1(532.57,1132.56) 1(532.57,1162.08) 1(544.38,894.37) 1(544.38,925.86) 1(544.38,957.36) 1(562.1,374.68) 1(562.1,512.48) 1(571.94,1063.66) 1(571.94,1191.61) 1(591.63,374.68) 1(591.63,512.48) 1(621.16,374.68) 1(621.16,512.48) 1(621.16,1063.66) 1(621.16,1191.61) 1(631,30.19) 1(670.37,1063.66) 1(670.37,1191.61) 1(680.21,227.04) 1(680.21,227.04) 1(690.05,69.56) 1(719.58,1063.66) 1(719.58,1191.61) 1(739.27,522.32) 1(739.27,551.85) 1(768.79,522.32) 1(768.79,551.85) 1(768.79,551.85) 1(798.32,522.32) 1(798.32,551.85) 1(818.01,1841.22) 1(818.01,1841.22) 1(827.85,522.32) 1(827.85,551.85) 1(837.69,79.41) 1(837.69,108.93) 1(857.38,522.32) 1(857.38,551.85) 1(867.22,79.41) 1(867.22,108.93) 1(886.9,1477.04) 1(896.75,79.41) 1(896.75,108.93) 1(896.75,1762.48) 1(926.27,79.41) 1(926.27,108.93) 1(1014.86,423.89) 1(1260.92,1654.21) 1(1260.92,1752.63) 1(1477.45,1756.57) 1(1477.45,1784.13) 1(1497.14,1240.82) 1(1497.14,1417.99) 1(1497.14,1555.78) 1(1505.01,1756.57) 1(1505.01,1784.13) 1(1516.82,20.35) 1(1516.82,482.95) 1(1526.67,1417.99) 1(1526.67,1555.78) 1(1540.45,1941.61) 1(1556.19,1417.99) 1(1556.19,1555.78) 1(1564.07,1941.61) 1(1566.04,295.94) 1(1575.88,138.46) 1(1585.72,1417.99) 1(1585.72,1555.78) 1(1587.69,1941.61) 1(1611.31,1941.61) 1(1615.25,1417.99) 1(1615.25,1555.78) 1(1634.94,1632.95) 1(1634.94,1941.61) 1(1664.46,20.35) 1(1703.83,719.17) 1(1723.52,-117.44) 1(1738.97,28.22) 1(1738.97,28.22) 1(1738.97,148.3) 1(1738.97,148.3) 1(1738.97,266.41) 1(1738.97,266.41) 1(1768.79,1898.3) 1(1768.79,1925.86) 1(1780.6,1681.77) 1(1782.57,473.11) 1(1807.87,89.25) 1(1807.87,89.25) 1(1807.87,207.36) 1(1807.87,207.36) 1(1807.87,325.47) 1(1807.87,325.47) 1(1808.16,1307.75) 1(1831.79,1941.61) 1(1841.33,-341.85) 1(1841.33,-223.74) 1(1841.63,1132.56) 1(1841.63,1260.51) 1(1841.63,1260.51) 1(1845.27,-192.25) 1(1851.47,916.02) 1(1853.14,-377.29) 1(1872.83,-180.44) 1(1876.77,433.74) 1(1879.03,1595.15) 1(1884.64,-389.1) 1(1904.32,-180.44) 1(1916.14,433.74) 1(1920.07,-389.1) 1(1935.82,-188.31) 1(1955.51,-385.16) 1(1955.51,-211.93) 1(1959.44,-349.73) 1(1959.44,-314.29) 1(1959.44,-278.86) 1(1959.44,-243.43) 1(1985.33,1941.61) 1(1989.27,1484.92) 1(1989.27,1705.39) 1(2095.57,1595.15) 1(2131,1941.61) 1(2146.75,778.22) 1(2166.43,-97.76) 1(2176.27,-402.88) 1(2176.27,1132.56) 1(2186.12,305.78) 1(2209.74,1303.82) 1(2215.64,797.91) 1(2215.64,916.02) 1(2215.64,916.02) 1(2274.7,856.97) 1(2274.7,856.97) 1(2274.7,975.08) 1(2274.7,975.08) 1(2280.6,1941.61) 1(2316.04,1272.32) 1(2316.04,1272.32) 1(2319.97,945.55) 1(2323.91,272.32) 1(2323.91,1329.41) 1(2331.79,1898.3) 1(2331.79,1925.86) 1(2347.53,272.32) 1(2349.21,0.67) 1(2349.21,40.04) 1(2349.21,79.41) 1(2349.21,118.78) 1(2359.05,-353.66) 1(2359.05,-353.66) 1(2359.05,-314.29) 1(2359.05,-274.92) 1(2359.05,-235.55) 1(2359.05,-196.18) 1(2371.16,272.32) 1(2392.81,660.11) 1(2394.78,1189.64) 1(2398.42,443.58) 1(2418.1,-393.03) 1(2418.1,-176.5) 1(2437.79,443.58) 1(2449.9,945.55) 1(2451.86,1900.27) 1(2461.71,856.97) 1(2465.64,1461.3) 1(2473.52,984.92) 1(2493.2,166.02) 1(2493.2,362.87) 1(2501.08,1732.95) 1(2501.08,1732.95) 1(2510.92,-97.76) 1(2530.6,1683.74) 1(2536.51,181.77) 1(2536.51,217.2) 1(2536.51,252.63) 1(2536.51,288.07) 1(2536.51,323.5)
  rect 55.12x62.99 on Mech1: 1(68.01,433.74) 1(68.01,729.01)
  rect 47.24x47.24 on Mech1: 1(131,498.7) 1(131,498.7) 1(131,498.7) 1(131,664.05) 1(131,664.05)
  rect 0x8.86 on Mech1: 1(189.07,1351.06) 1(189.07,1351.06) 1(250.09,1351.06) 1(250.09,1351.06) 1(250.09,1351.06)
  rect 35.43x51.18 on Mech1: 1(197.93,1423.89) 1(316.04,1423.89) 1(316.04,1423.89)
  rect 0x0 on Mech1: 1(212.89,913.26) 1(212.89,961.69) 1(212.89,1001.85) 1(212.89,1041.22) 1(212.89,1081.37) 1(212.89,1129.8) 1(237.3,521.93) 1(237.3,521.93) 1(237.3,562.08) 1(237.3,562.08) 1(237.3,562.08) 1(318.99,1335.31) 1(318.99,1335.31) 1(318.99,1335.31) 1(355.01,1004.6) 1(355.01,1004.6) 1(355.01,1004.6) 1(355.01,1043.97) 1(355.01,1043.97) 1(355.01,1043.97) 1(377.06,925.86) 1(377.06,925.86) 1(377.06,925.86) 1(395.17,1004.6) 1(395.17,1004.6) 1(395.17,1043.97) 1(395.17,1043.97) 1(435.13,1335.31) 1(435.13,1335.31) 1(491.23,925.86) 1(491.23,925.86) 1(869.68,150.27) 1(869.68,150.27) 1(869.68,150.27) 1(869.68,225.08) 1(869.68,225.08) 1(869.68,225.08) 1(943.5,187.67) 1(943.5,187.67) 1(1327.85,1486.89) 1(1327.85,1486.89) 1(1327.85,1486.89) 1(1548.32,1486.89) 1(1548.32,1486.89) 1(1566.04,1771.73) 1(1566.04,1771.73) 1(1566.04,1887.87) 1(1566.04,1887.87) 1(1566.04,1887.87) 1(1634.94,1663.26) 1(1634.94,1663.26) 1(1634.94,1701.06) 1(1634.94,1701.06) 1(1634.94,1701.06) 1(1634.94,1860.11) 1(1634.94,1860.11) 1(1634.94,1897.91) 1(1634.94,1897.91) 1(1634.94,1897.91) 1(2385.92,788.07) 1(2385.92,827.44) 1(2385.92,827.44) 1(2385.92,827.44) 1(2385.92,866.81) 1(2385.92,866.81) 1(2385.92,866.81) 1(2385.92,906.18) 1(2385.92,906.18) 1(2385.92,906.18) 1(2385.92,945.55) 1(2385.92,945.55) 1(2385.92,945.55) 1(2385.92,984.92) 1(2385.92,984.92) 1(2385.92,984.92) 1(2485.33,736.89) 1(2485.33,736.89) 1(2485.33,1036.1) 1(2501.08,1859.43) 1(2501.08,1859.43) 1(2501.08,1921.43) 1(2501.08,1921.43) 1(2501.08,1921.43)
  rect 0x6.69 on Mech1: 1(237.3,601.85) 1(237.3,601.85) 1(237.3,601.85) 1(237.3,639.64) 1(237.3,639.64) 1(895.76,1674.68) 1(895.76,1674.68) 1(895.76,1674.68) 1(895.76,1712.48) 1(895.76,1712.48) 1(2491.23,208.15) 1(2491.23,208.15) 1(2491.23,208.15) 1(2491.23,245.94) 1(2491.23,245.94) 1(2491.23,286.89) 1(2491.23,286.89) 1(2491.23,286.89) 1(2491.23,324.68) 1(2491.23,324.68)
  oct 0x0 on Mech1: 1(256.98,1427.34)
  rect 0x8.61 on Mech1: 1(363.77,1103.03) 1(363.77,1103.03) 1(425.78,1103.03) 1(425.78,1103.03) 1(425.78,1103.03)
  rect 0x59.06 on Mech1: 1(569.97,443.58) 1(569.97,443.58) 1(790.45,443.58) 1(790.45,443.58) 1(790.45,443.58)
  rect 0x5.32 on Mech1: 1(758.56,187.67) 1(758.56,187.67) 1(758.56,227.04) 1(758.56,227.04) 1(798.71,187.67) 1(798.71,187.67) 1(798.71,187.67) 1(798.71,227.04) 1(798.71,227.04) 1(798.71,227.04)